# Altium PCB V11_Board.PcbDoc (part 1 of 2)
Units mil, origin at the board's own origin, x right, y up, seen from the top; angles counter-clockwise.
Board outline 6000 x 4000 mil, 2 copper layers (Top Layer, Bottom Layer); 168 components, 105 nets, 506 pads, 0 vias.
Unrouted connection lines stored in the file: 378.
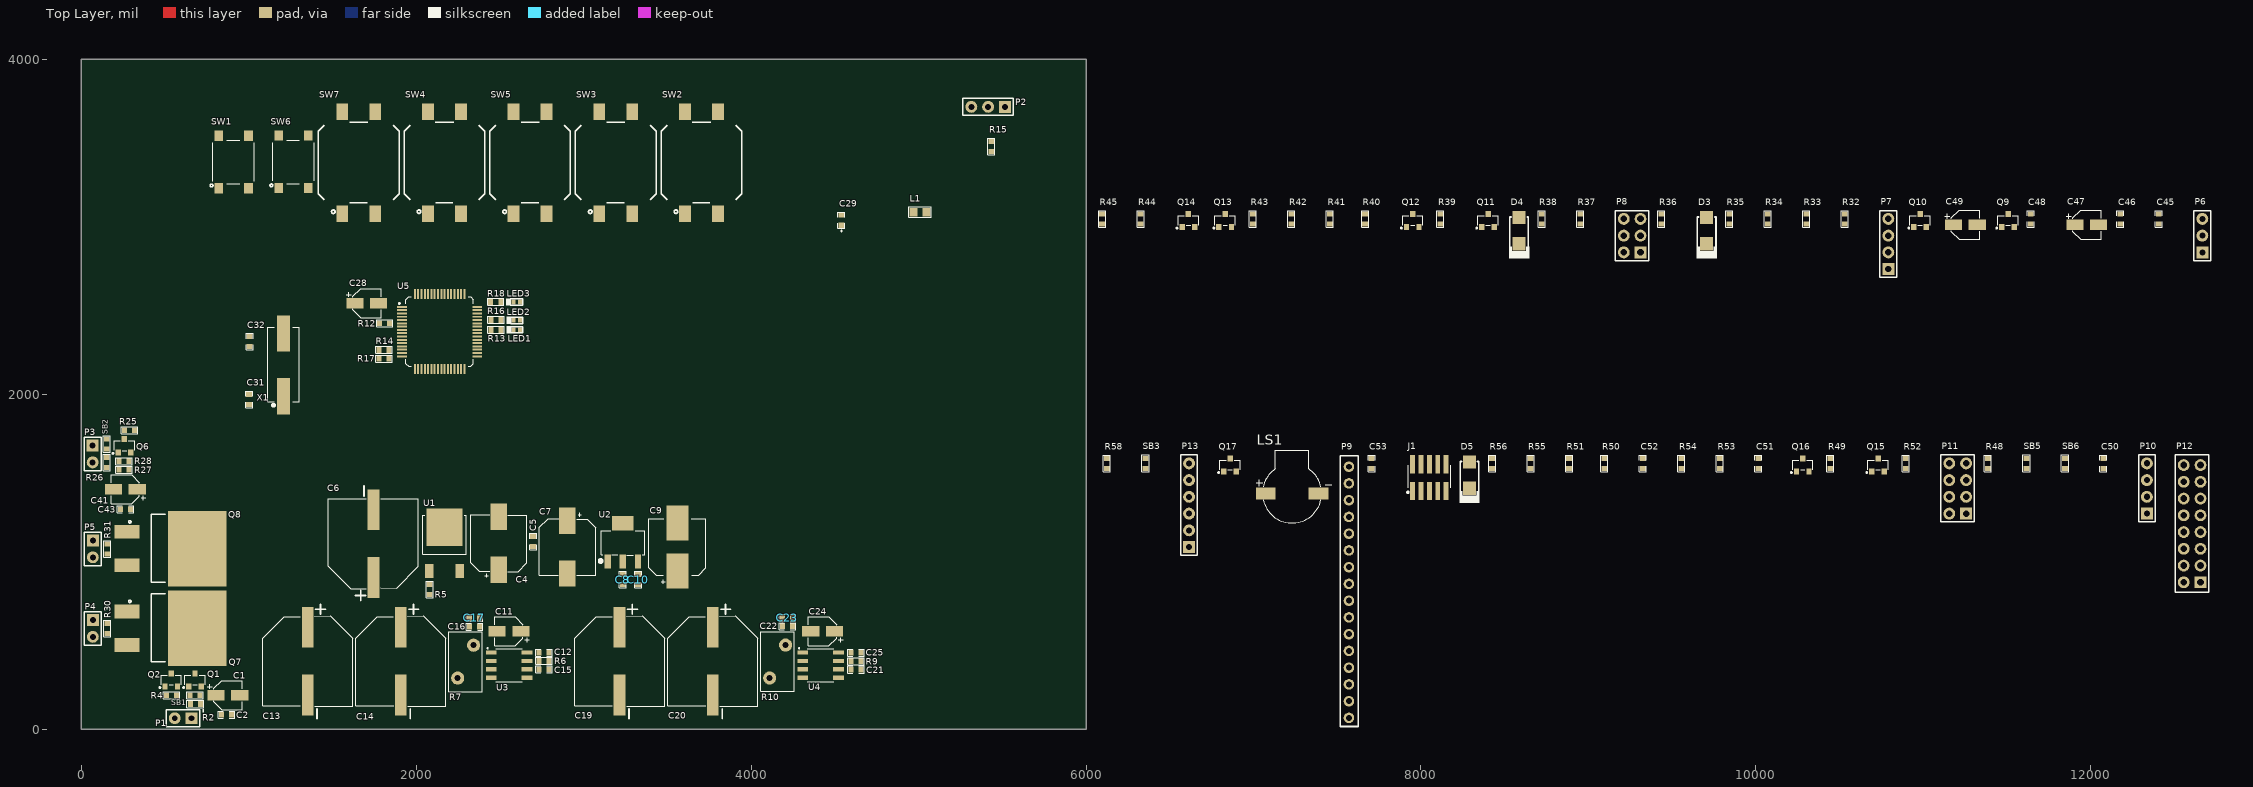
[diagram p0: Top Layer view]
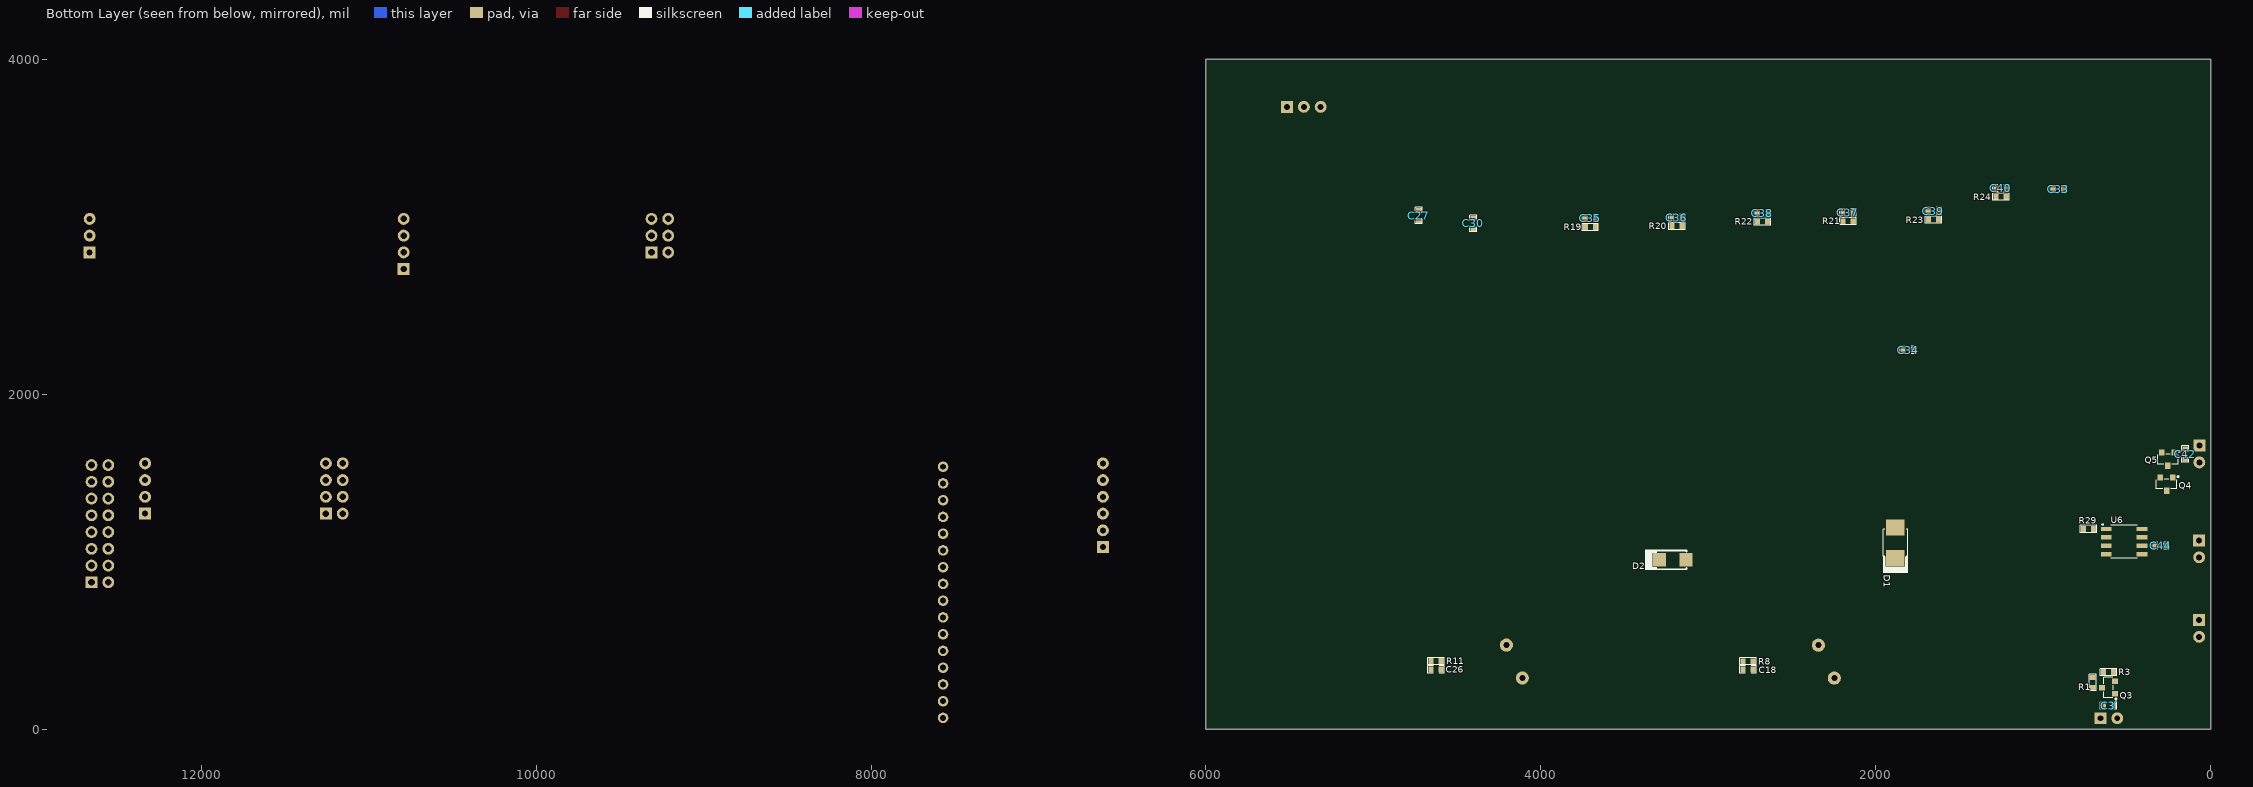
[diagram p1: Bottom Layer view, seen from below]

## Layer stack, top to bottom
Top Solder: solder mask 0.4, Solder Resist, Dk 3.5
Top Layer: signal copper 1.4
Dielectric 1: dielectric 12.6, FR-4, Dk 4.8
Bottom Layer: signal copper 1.4
Bottom Solder: solder mask 0.4, Solder Resist, Dk 3.5

## Board outline
0,0 6000,0 6000,4000 0,4000

## Design rules (kind name [scope] priority, off if disabled: settings)
Clearance [All] p1: gap=7 ignorepadtopadclearanceinfootprint=FALSE except(5: Arc-SMDPad Track-SMDPad SMDPad-SMDPad)
ComponentClearance [All] p1: gap=0 collisioncheckmode=3 verticalgap=0 showdistances=FALSE
HoleSize [All] p1: absolutevalues=TRUE maxlimit=1000 minlimit=1 maxpercent=80.000 minpercent=20.000
HoleToHoleClearance [All] p1: gap=0 allowstackedmicrovias=TRUE
MinimumSolderMaskSliver [All] p1: minsoldermaskwidth=0
PolygonConnect [All] p1: connectstyle=Relief reliefconductorwidth=10 reliefentries=4 polygonreliefangle="90 Angle" airgapwidth=10
RoutingVias [All] p1: holewidth=11.81 width=23.62 viastyle="Through Hole" minholewidth=11.81 minwidth=23.62 maxholewidth=31.5 maxwidth=62.99
SilkToSilkClearance [All] p1: silktosilkclearance=0
SilkToSolderMaskClearance [IsPad] p1: minsilkscreentomaskgap=0 clearancetoexposedcopper=TRUE
SolderMaskExpansion [All] p1: expansion=4 istentingtop=FALSE
Width [All] p1: maxlimit=100 minlimit=8 preferedwidth=12
24 further rules are at their usual default settings.

## Classes and differential pairs
component class U_Temperature_Sensor_Section: C45 C46 C47 C48 C49 D3 D4 P6 P7 P8 Q9 Q10 Q11 Q12 Q13 Q14 R32 R33 R34 R35 R36 R37 R38 R39 R40 R41 R42 R43 R44 R45
component class U_Switches_Sheet: C35 C36 C37 C38 C39 C40 R19 R20 R21 R22 R23 R24 SW2 SW3 SW4 SW5 SW6 SW7
component class U_Regulator_Sheet: C4 C5 C6 C7 C8 C9 C10 D1 D2 R5 U1 U2
component class U_Heater_Sheet: C41 C42 C43 P3 Q4 Q5 Q6 R25 R26 R27 R28 SB2
component class U_Gate_Driver_Sheet: C44 P4 P5 Q7 Q8 R29 R30 R31 U6
component class U_Current_Sense_Sheet: C11 C12 C13 C14 C15 C16 C17 C18 C19 C20 C21 C22 C23 C24 C25 C26 R6 R7 R8 R9 R10 R11 U3 U4
component class U_Controller_Section: C27 C28 C29 C30 C31 C32 C33 C34 L1 LED1 LED2 LED3 P2 R12 R13 R14 R15 R16 R17 R18 SW1 U5 X1
component class U_Connector_Section: C50 C51 C52 C53 D5 J1 LS1 P9 P10 P11 P12 P13 Q15 Q16 Q17 R48 R49 R50 R51 R52 R53 R54 R55 R56 R58 SB3 SB5 SB6
component class U_Battery_Charger_Sheet: C1 C2 C3 P1 Q1 Q2 Q3 R1 R2 R3 R4 SB1

## Components (designator, comment, footprint, x,y, rotation, side; value= is the part's Value field where it differs from the comment)
C1 "10uF" RVT1E100M0405. 875,203 r0 top
C2 "1uF" Cap0603 866,86 r0 top
C3 "0.1uF" Cap0603 611,140 r0 bottom
C4 "220uF" UCD1H221MNL1GS 2494,1109.94 r90 top
C5 "0.1uF" Cap0603 2698,1120 r90 top
C6 "470uF" VT1H471MI135000CE0 1745,1107.61 r90 top
C7 "220uF" UCD1H221MNL1GS 2903,1087 r270 top
C8 "0.1uF" Cap0603 3234,893 r270 top
C9 "100uF" UWX1E101MCL1GB 3560,1087 r90 top
C10 "0.1uF" Cap0603 3325,893 r270 top
C11 "10uF" RVT1E100M0405. 2554,584 r180 top
C12 "0.1uF" Cap0603 2763,457 r0 top
C13 "470uF" VT1H471MI135000CE0 1351,406.07 r270 top
C14 "470uF" VT1H471MI135000CE0 1907,406.07 r270 top
C15 "1uF" Cap0603 2763,357 r0 top
C16 "1uF" Cap0603 2348,612 r180 top
C17 "0.1uF" Cap0603 2348,664 r180 top
C18 "1uF" Cap0603 2762,356 r180 bottom
C19 "470uF" VT1H471MI135000CE0 3214,406.07 r270 top
C20 "470uF" VT1H471MI135000CE0 3770,406.07 r270 top
C21 "1uF" Cap0603 4626,356 r0 top
C22 "1uF" Cap0603 4217,615 r180 top
C23 "0.1uF" Cap0603 4217,666 r180 top
C24 "10uF" RVT1E100M0405. 4427,584 r180 top
C25 "0.1uF" Cap0603 4626,457 r0 top
C26 "1uF" Cap0603 4626,356 r180 bottom
C27 "0.1uF" Cap0603 4728,3067 r90 bottom
C28 "10uF" RVT1E100M0405. 1705,2544 r0 top
C29 "1uF" F981E105MMA 4539,3039 r90 top
C30 "0.1uF" Cap0603 4404,3020 r90 bottom
C31 "30pF" Cap0603 1002,1969 r90 top
C32 "30pF" Cap0603 1005,2314 r90 top
C33 "0.1uF" Cap0603 910,3225 r180 bottom
C34 "0.1uF" Cap0603 1807,2264 r180 bottom
C35 "0.1uF" Cap0603 3705,3050 r0 bottom
C36 "0.1uF" Cap0603 3188,3055 r0 bottom
C37 "0.1uF" Cap0603 2167,3085 r0 bottom
C38 "0.1uF" Cap0603 2677,3081 r0 bottom
C39 "0.1uF" Cap0603 1656,3094 r0 bottom
C40 "0.1uF" Cap0603 1253,3229 r0 bottom
C41 "10uF" RVT1E100M0405. 263,1432 r180 top
C42 "0.1uF" Cap0603 152,1642 r90 bottom
C43 "1uF" Cap0603 264,1313 r180 top
C44 "0.1uF" Cap0603 299,1095 r180 bottom
C45 "0.1uF" Cap0603 12406,3047 r90 top
C46 "0.1uF" Cap0603 12176,3047 r90 top
C47 "10uF" RVT1E100M0405. 11976,3012 r0 top
C48 "0.1uF" Cap0603 11641,3047 r90 top
C49 "10uF" RVT1E100M0405. 11251,3012 r0 top
C50 "0.1uF" Cap0603 12075,1587 r90 top
C51 "0.1uF" Cap0603 10015,1587 r90 top
C52 "0.1uF" Cap0603 9325,1587 r90 top
C53 "1uF" Cap0603 7705,1587 r90 top
D1 "SS510B" SS510B 1883,1113 r90 bottom
D2 "1SMA5930BT3G" SMA 3212,1011 r180 bottom
D3 "SMAJ5.0CA" SMA 9706,2977 r90 top
D4 "SMAJ5.0CA" SMA 8586,2977 r90 top
D5 "SMAJ5.0CA" SMA 8290,1517 r90 top
J1 "FTSH-105-01-L-DV-K-TR" FTSH-105-01-L-DV-K-TR 8050,1502 r0 top
L1 "10uH" Ind0805 5008,3087 r0 top
LED1 "XZMDK68W-2" "LED 0402" 2600.7,2385 r180 top
LED2 "XZMDK68W-2" "LED 0402" 2600.7,2441 r180 top
LED3 "XZMDK68W-2" "LED 0402" 2600,2551 r180 top
LS1 "YS-SBZ9032C03R16" YS-SBZ9032C03R16 7230,1408 r0 top
P1 "61300211121" HDR1X2 658,65 r180 top
P2 "61300311121" HDR1X3 5515,3716 r180 top
P3 "61300211121" HDR1X2 68,1693 r270 top
P4 "61300211121" HDR1X2 69,651 r270 top
P5 "61300211121" HDR1X2 69,1126 r270 top
P6 "61300311121" HDR1X3 12666,2847 r90 top
P7 "61300411121" HDR1X4 10791,2747 r90 top
P8 "M20-9980346" HDR2X3 9311,2847 r90 top
P9 "PPPC161LFBN-RC" PPPC161LFBN-RC 7570,817 r90 top
P10 "61300411121" HDR1X4 12335,1287 r90 top
P11 "M20-9760446" HDR2X4 11255,1287 r90 top
P12 "PPTC082LFBN-RC" HDR2X8 12605,1227 r90 top
P13 "61300611121" HDR1X6 6615,1087 r90 top
Q1 "IRLML6402TRPBF" SOT-23 679,293 r0 top
Q2 "MMBT5551" SOT-23 537,293 r0 top
Q3 "IRLML2502TRPBF" SOT-23 611,248 r90 bottom
Q4 "IRLML6402TRPBF" SOT-23 263,1463 r0 bottom
Q5 "MMBT5551" SOT-23 256,1612 r0 bottom
Q6 "IRLML2502TRPBF" SOT-23 257,1692 r0 top
Q7 "IRF3205STRLPBF" D2Pak 482,603 r270 top
Q8 "IRF3205STRLPBF" D2Pak 482,1078 r270 top
Q9 "MMBT5551" SOT-23 11506,3037 r0 top
Q10 "MMBT5551" SOT-23 10981,3037 r0 top
Q11 "IRLML6402TRPBF" SOT-23 8401,3037 r0 top
Q12 "MMBT5551" SOT-23 7951,3037 r0 top
Q13 "MMBT5551" SOT-23 6831,3037 r0 top
Q14 "MMBT5551" SOT-23 6611,3037 r0 top
Q15 "MMBT5551" SOT-23 10730,1577 r0 top
Q16 "IRLML2502TRPBF" SOT-23 10280,1577 r0 top
Q17 "MMBT5551" SOT-23 6860,1577 r0 top
R1 "1K" RES-0603 705,279 r90 bottom
R2 "10K" RES-0603 680,202 r0 top
R3 "1K" RES-0603 611,341 r180 bottom
R4 "10K" RES-0603 539,202 r180 top
R5 "33R" RES-0603 2080,834 r270 top
R6 "2.2K" RES-0603 2763,407 r180 top
R7 "MOV-07D220K" MOV-07D220K 2295,403 r90 top
R8 "470K" RES-0603 2762,405 r0 bottom
R9 "2.2K" RES-0603 4626,406 r180 top
R10 "MOV-07D220K" MOV-07D220K 4158,403.74 r90 top
R11 "470K" RES-0603 4626,406.5 r0 bottom
R12 "390R" RES-0603 1812,2424 r180 top
R13 "680R" RES-0603 2475.7,2384 r0 top
R14 "6.8K" RES-0603 1808,2265 r0 top
R15 "2.2K" RES-0603 5434,3479 r90 top
R16 "680R" RES-0603 2475.7,2444 r0 top
R17 "3.3K" RES-0603 1808,2213 r0 top
R18 "680R" RES-0603 2475,2551 r0 top
R19 "2.2K" RES-0603 3705,2998 r180 bottom
R20 "2.2K" RES-0603 3188,3004 r180 bottom
R21 "2.2K" RES-0603 2167,3033 r180 bottom
R22 "2.2K" RES-0603 2677,3030 r180 bottom
R23 "2.2K" RES-0603 1656,3043 r180 bottom
R24 "330R" RES-0603 1253,3178 r180 bottom
R25 "1K" RES-0603 287,1785 r0 top
R26 "10K" RES-0603 152,1593 r90 top
R27 "1K" RES-0603 256,1550 r0 top
R28 "10K" RES-0603 256,1601 r180 top
R29 "1K" RES-0603 730,1195 r0 bottom
R30 "47R" RES-0603 156,602 r270 top
R31 "47R" RES-0603 156,1076 r270 top
R32 "10K" RES-0603 10531,3047 r90 top
R33 "330 ohm" RES-0603 10301,3047 r90 top
R34 "10K" RES-0603 10071,3047 r90 top
R35 "1.5R" RES-0603 9841,3047 r90 top
R36 "330R" RES-0603 9436,3047 r90 top
R37 "0R" RES-0603 8951,3047 r90 top
R38 "0R" RES-0603 8721,3047 r90 top
R39 "1K" RES-0603 8116,3047 r90 top
R40 "1.5R" RES-0603 7666,3047 r90 top
R41 "10K" RES-0603 7456,3047 r90 top
R42 "10K" RES-0603 7226,3047 r90 top
R43 "1K" RES-0603 6996,3047 r90 top
R44 "4.7K" RES-0603 6326,3047 r90 top
R45 "4.7K" RES-0603 6096,3047 r90 top
R48 "10K" RES-0603 11385,1587 r90 top
R49 "10K" RES-0603 10445,1587 r90 top
R50 "2.2K" RES-0603 9095,1587 r90 top
R51 "10K" RES-0603 8885,1587 r90 top
R52 "0R" RES-0603 10895,1587 r90 top
R53 "4.7K" RES-0603 9785,1587 r90 top
R54 "4.7K" RES-0603 9555,1587 r90 top
R55 "1K" RES-0603 8655,1587 r90 top
R56 "1K" RES-0603 8425,1587 r90 top
R58 "4.7K" RES-0603 6125,1587 r90 top
SB1 "Solder Bridge" "Solder Bridge" 681,150 r180 top
SB2 "Solder Bridge" "Solder Bridge" 152,1703 r90 top
SB3 "Solder Bridge" "Solder Bridge" 6355,1587 r90 top
SB5 "Solder Bridge" "Solder Bridge" 11615,1587 r90 top
SB6 "Solder Bridge" "Solder Bridge" 11845,1587 r90 top
SW1 "PTS645SM43SMTR92LFS" PTS645SM43SMTR92LFS 910,3387 r90 top
SW2 "Tactile Switch" TL3300CF160Q 3703,3383 r90 top
SW3 "Tactile Switch" TL3300CF160Q 3191.5,3383 r90 top
SW4 "Tactile Switch" TL3300CF160Q 2168.5,3383 r90 top
SW5 "Tactile Switch" TL3300CF160Q 2680,3383 r90 top
SW6 "PTS645SM43SMTR92LFS" PTS645SM43SMTR92LFS 1267,3388 r90 top
SW7 "Tactile Switch" TL3300CF160Q 1657,3383 r90 top
U1 "LM78M05CDT" TO-252-3 2169,1075 r0 top
U2 "LMS8117AMP-3.3/NOPB" SOT-223 3234,1115 r0 top
U3 "ACS723LLCTR-20AU-T" SOIC-8 2554,382 r0 top
U4 "ACS723LLCTR-20AU-T" SOIC-8 4414,382 r0 top
U5 "STM32F072R8T6" "64LQFP (10X10)" 2140,2374 r0 top
U6 "NCP81071ADR2G" SOIC-8 518,1120 r180 bottom
X1 "9C-8.000MEEJ-T" 9C-8.000MEEJ-T 1207,2175 r90 top

## Footprints (in the part's own frame and the unit in brackets; to place one, negate y for a bottom-side part, rotate by r counter-clockwise, add the part's x,y. Pads: shape width x height; smd on the part's side, far side on the other; paste and mask are expansions set on the pad)
9C-8.000MEEJ-T [mm] "CRYSTAL 8.0000MHZ 18PF SMD"
  rect 5.5x2 smd: 1(-4.75,0) 2(4.75,0)
  silkscreen extent -6.25,-2.41 5.71,2.41, body extent -6.07,-2.35 6.23,2.35, height 4.36
"64LQFP (10X10)" [mm]
  rect 1.5x0.3 smd: 1(-5.7,3.75) 2(-5.7,3.25) 3(-5.7,2.75) 4(-5.7,2.25) 5(-5.7,1.75) 6(-5.7,1.25) 7(-5.7,0.75) 8(-5.7,0.25) 9(-5.7,-0.25) 10(-5.7,-0.75) 11(-5.7,-1.25) 12(-5.7,-1.75) 13(-5.7,-2.25) 14(-5.7,-2.75) 15(-5.7,-3.25) 16(-5.7,-3.75) 33(5.7,-3.75) 34(5.7,-3.25) 35(5.7,-2.75) 36(5.7,-2.25) 37(5.7,-1.75) 38(5.7,-1.25) 39(5.7,-0.75) 40(5.7,-0.25) 41(5.7,0.25) 42(5.7,0.75) 43(5.7,1.25) 44(5.7,1.75) 45(5.7,2.25) 46(5.7,2.75) 47(5.7,3.25) 48(5.7,3.75)
  rect 0.3x1.5 smd: 17(-3.75,-5.7) 18(-3.25,-5.7) 19(-2.75,-5.7) 20(-2.25,-5.7) 21(-1.75,-5.7) 22(-1.25,-5.7) 23(-0.75,-5.7) 24(-0.25,-5.7) 25(0.25,-5.7) 26(0.75,-5.7) 27(1.25,-5.7) 28(1.75,-5.7) 29(2.25,-5.7) 30(2.75,-5.7) 31(3.25,-5.7) 32(3.75,-5.7) 49(3.75,5.7) 50(3.25,5.7) 51(2.75,5.7) 52(2.25,5.7) 53(1.75,5.7) 54(1.25,5.7) 55(0.75,5.7) 56(0.25,5.7) 57(-0.25,5.7) 58(-0.75,5.7) 59(-1.25,5.7) 60(-1.75,5.7) 61(-2.25,5.7) 62(-2.75,5.7) 63(-3.25,5.7) 64(-3.75,5.7)
  silkscreen extent -6.22,-5.26 5.13,5.26, body extent -6.01,-6.01 6.01,6.01, height 1.6
Cap0603 [mil]
  rect 30x35 smd mask+2.36: 1(-30,0) 2(30,0)
  silkscreen extent -49,-21 49,21, body extent -32,-16 31,16, height 34
D2Pak [mm]
  rect 2.08x3.81 smd: 1(-2.54,-5.335) 3(2.54,-5.335)
  rect 11.43x8.89 smd: 2(0,5.335)
  silkscreen extent -5.21,-5.05 5.11,0.51, body extent -5.08,-6.6 5.02,8.79, height 4.5
F981E105MMA [mil]
  rect 30x35 smd mask+2.36: 1(-30,0) 2(30,0)
  silkscreen extent -72,-21 49,21, body extent -32,-16 31,16, height 34
FTSH-105-01-L-DV-K-TR [mm]
  rect 0.74x2.79 smd: 1(-2.54,-2.035) 2(-2.54,2.035) 3(-1.27,-2.035) 4(-1.27,2.035) 5(0,-2.035) 6(0,2.035) 7(1.27,-2.035) 8(1.27,2.035) 9(2.54,-2.035) 10(2.54,2.035)
  silkscreen extent -3.39,-2.37 3.23,1.88, body extent -3.18,-2.84 3.17,3, height 6.11
HDR1X2 [mm] "CONN HEADER VERT 2POS 2.54MM"
  rect 1.8x1.8 hole 0.9: 1(0,0)
  round 1.8 hole 0.9: 2(2.54,0)
  silkscreen extent -1.27,-1.27 3.81,1.27, body extent -1.27,-1.27 3.81,1.27, height 8.44
HDR1X3 [mm] "Connector; Header; 3 Position"
  rect 1.8x1.8 hole 0.9: 1(0,0)
  round 1.8 hole 0.9: 2(2.54,0) 3(5.08,0)
  silkscreen extent -1.27,-1.27 6.35,1.27, body extent -1.27,-1.24 6.35,1.25, height 8.54
HDR1X4 [mm] "Connector; Header; 4 Position"
  rect 1.8x1.8 hole 0.95: 1(0,0)
  round 1.8 hole 0.95: 2(2.54,0) 3(5.08,0) 4(7.62,0)
  silkscreen extent -1.27,-1.27 8.89,1.27, body extent -1.27,-1.27 8.89,1.27, height 9.5
HDR1X6 [mm] "Connector; Header; 6 Position"
  rect 1.8x1.8 hole 0.9: 1(0,0)
  round 1.8 hole 0.9: 2(2.54,0) 3(5.08,0) 4(7.62,0) 5(10.16,0) 6(12.7,0)
  silkscreen extent -1.27,-1.27 13.97,1.27, body extent -1.27,-1.24 13.97,1.25, height 8.54
HDR2X3 [mm] "Connector; Header; 3x2 Position"
  rect 1.8x1.8 hole 1: 1(0,0)
  round 1.8 hole 1: 2(0,2.54) 3(2.54,0) 4(2.54,2.54) 5(5.08,0) 6(5.08,2.54)
  silkscreen extent -1.27,-1.27 6.35,3.81, body extent -1.27,-1.3 6.35,3.78, height 9.2
HDR2X4 [mm] "Connector; Header; 4x2 Position"
  rect 1.8x1.8 hole 1: 1(0,0)
  round 1.8 hole 1: 2(0,2.54) 3(2.54,0) 4(2.54,2.54) 5(5.08,0) 6(5.08,2.54) 7(7.62,0) 8(7.62,2.54)
  silkscreen extent -1.27,-1.27 8.89,3.81, body extent -1.24,-1.27 8.92,3.71, height 8.84
HDR2X8 [mm] "Connector; Header; 8x2 Position"
  rect 1.8x1.8 hole 1: 1(-8.89,-1.27)
  round 1.8 hole 1: 2(-8.89,1.27) 3(-6.35,-1.27) 4(-6.35,1.27) 5(-3.81,-1.27) 6(-3.81,1.27) 7(-1.27,-1.27) 8(-1.27,1.27) 9(1.27,-1.27) 10(1.27,1.27) 11(3.81,-1.27) 12(3.81,1.27) 13(6.35,-1.27) 14(6.35,1.27) 15(8.89,-1.27) 16(8.89,1.27)
  silkscreen extent -10.39,-2.54 10.41,2.54, body extent -10.41,-2.5 10.41,2.5, height 8.5
Ind0805 [mm] "Inductor 0805"
  rect 1.2x1.32 smd: 1(-1,0) 2(1,0)
  silkscreen extent -1.72,-0.79 1.73,0.79, body extent -1,-0.62 1,0.63, height 0.47
"LED 0402" [mm]
  rect 0.62x0.72 smd: 1(-0.475,0) 2(0.475,0)
  silkscreen extent -0.91,-0.56 1.6,0.56, body extent -0.5,-0.25 0.51,0.25, height 0.45
MOV-07D220K [mm]
  round 2 hole 0.9: 1(-2.5,1.206) 2(2.5,-1.206)
  silkscreen extent -4.55,-2.54 4.55,2.54, body extent -4.5,-2.5 4.5,2.5, height 12.5
PPPC161LFBN-RC [mm] "CONN HDR 16POS 0.1 GOLD PCB"
  round 1.6 hole 0.9: 1(-19.05,0) 2(-16.51,0) 3(-13.97,0) 4(-11.43,0) 5(-8.89,0) 6(-6.35,0) 7(-3.81,0) 8(-1.27,0) 9(1.27,0) 10(3.81,0) 11(6.35,0) 12(8.89,0) 13(11.43,0) 14(13.97,0) 15(16.51,0) 16(19.05,0)
  silkscreen extent -20.35,-1.42 20.73,1.32, body extent -20.59,-1.3 20.55,1.2, height 5
PTS645SM43SMTR92LFS [mm] "SWITCH TACTILE SPST-NO 0.05A 12V"
  rect 1.55x1.3 smd: 1(-3.975,2.25) 2(3.975,2.25) 3(-3.975,-2.25) 4(3.975,-2.25)
  silkscreen extent -3.79,-3.15 3.3,3.56, body extent -4.5,-3.1 4.5,3.1, height 13
RES-0603 [mil]
  rect 30x35 smd: 1(-30,0) 2(30,0)
  silkscreen extent -49,-21 49,21, body extent -31,-17 31,17, height 18
RVT1E100M0405. [mm] "10uF 25V 5.4mm SMD"
  rect 2.6x1.6 smd: 1(-1.8,0) 2(1.8,0)
  silkscreen extent -3.1,-2.21 2.16,2.21, body extent -2.65,-2.15 2.65,2.15, height 3.95
SMA [mm]
  rect 2x2 smd: 1(-2,0) 2(2,0)
  silkscreen extent -4.24,-1.55 2.08,1.55, body extent -2.6,-1.3 2.6,1.3, height 2.4
SOIC-8 [mm]
  rect 1.6x0.65 smd: 1(-2.667,1.905) 2(-2.667,0.635) 3(-2.667,-0.635) 4(-2.667,-1.905) 5(2.733,-1.905) 6(2.733,-0.635) 7(2.733,0.635) 8(2.733,1.905)
  silkscreen extent -3.34,-2.54 1.99,2.68, body extent -3,-2.46 3,2.46, height 1.61
"Solder Bridge" [mil] "Solder Bridge ON"
  rect 30x35 smd: 1(-30,0) 2(30,0)
  silkscreen extent -50,-22 50,22
SOT-23 [mm] "TRANS NPN 40V 0.6A SOT23"
  rect 0.82x0.92 smd: 1(-0.95,-1) 2(0.95,-1) 3(0,1)
  silkscreen extent -1.82,-1.23 1.55,0.74, body extent -1.5,-1.25 1.5,1.25, height 1.1
SOT-223 [mm]
  rect 0.95x2.15 smd: 1(-2.3,-2.9) 2(0,-2.9) 3(2.3,-2.9)
  rect 3.25x2.15 smd: 4(0,2.9)
  silkscreen extent -3.6,-3.07 3.3,1.75, body extent -3.28,-3.51 3.22,3.45, height 1.65
SS510B [mm]
  rect 2.4x2.8 smd: 1(-2.3,0) 2(2.3,0)
  silkscreen extent -4.57,-1.91 2.03,1.91, body extent -2.7,-1.8 2.7,1.8, height 2.3
TL3300CF160Q [mm] "SWITCH TACTILE SPST-NO 0.05A 12V"
  rect 2.5x1.8 smd: 1(-7.75,2.5) 2(7.75,2.5) 3(-7.75,-2.5) 4(7.75,-2.5)
  silkscreen extent -7.71,-6.12 6.15,6.12, body extent -7.5,-5.98 7.5,6.02, height 8.77
TO-252-3 [mm]
  rect 1.3x2.15 smd: 1(-2.285,-3.333) 3(2.285,-3.333)
  rect 5.5x5.7 smd: 2(0,3.333)
  silkscreen extent -3.33,-0.81 3.33,5.13, body extent -3.27,-3.79 3.27,6.12, height 2.67
UCD1H221MNL1GS [mm] "CAP ALUM 220UF 20% 50V SMD"
  rect 4x2.5 smd: 1(-4,0) 2(4,0)
  silkscreen extent -5.18,-4.24 4.29,4.29, body extent -4.67,-4.23 4.62,4.28, height 10.34
UWX1E101MCL1GB [mm]
  rect 5.3x3.3 smd: 1(-3.65,0) 2(3.65,0)
  silkscreen extent -5.59,-4.32 4.27,4.32, body extent -4.65,-4.25 4.65,4.25, height 10.34
VT1H471MI135000CE0 [mm] "470uF ±20% 50V 12.5mm 13.5mm 1000hrs 105? -40?~+105? SMD,12.5x13.5mm Aluminum Electrolytic Capacitors - SMD RoHS"
  rect 6.2x1.75 smd: 1(-5.145,0) 2(5.145,0)
  silkscreen extent -8.62,-6.81 8.74,6.86, body extent -7.5,-6.85 7.5,6.85, height 14
YS-SBZ9032C03R16 [mm] "NO 2700Hz 85dB @ 3V, 10cm 3V F9mm SMD,9x3.2mm Buzzers RoHS"
  rect 3x1.8 smd: 1(-4,0) 2(4,0)
  silkscreen extent -5.46,-4.5 6.06,6.54, body extent -5.25,-4.5 5.25,6.5, height 3.3

## Part data
C1 C11 C24 C28 C41 C47 C49: library part RVT1E100M0405, "CAP ALUM 10uF 25V SMD", MANUFACTURER=ROQANG, Operating Temperature=-45℃~+105℃, Rated Voltage=25V, Tolerance=±20%, Capacitance=10uF, L=5.4mm, φD=4mm
C2 C15 C16 C18 C21 C22 C26 C43 C53: library part CC0603KRX5R8BB105, "CAP CER 1UF 25V X5R 0603", Case Code (Imperial)=0603, Case Code (Metric)=1608, Dielectric=X5R, MANUFACTURER=Yageo, Max Operating Temperature=85°C, Min Operating Temperature=-55°C, Package Quantity=1, Supplier Part Number 1=311-1445-6-ND, Tolerance=10%, Voltage Rating=25V, Capacitance=1uF, Case/Package=0603, ComponentLink1Description=http://www.yageo.com/documents/recent/UPY-GPHC_X5R_4V-to-50V_25.pdf?src-supplier=Digi-Key, ComponentLink1URL=http://www.yageo.com/documents/recent/UPY-GPHC_X5R_4V-to-50V_25.pdf?src-supplier=Digi-Key, ComponentLink2Description=http://www.yageo.com/documents/recent/UPY-GPHC_X5R_4V-to-50V_12.pdf?src-supplier=Avnet+Europe, ComponentLink2URL=http://www.yageo.com/documents/recent/UPY-GPHC_X5R_4V-to-50V_12.pdf?src-supplier=Avnet+Europe, ComponentLink3Description=http://www.farnell.com/datasheets/1525783.pdf?src-supplier=Element14, ComponentLink3URL=http://www.farnell.com/datasheets/1525783.pdf?src-supplier=Element14, ComponentLink4Description=http://www.yageo.com/documents/recent/UPY-GPHC_X5R_4V-to-50V_12.pdf?src-supplier=Avnet, ComponentLink4URL=http://www.yageo.com/documents/recent/UPY-GPHC_X5R_4V-to-50V_12.pdf?src-supplier=Avnet, Depth=0.8mm, Halogen Free="Halogen Free", Height=0.8mm, Lead Free="Lead Free", Length=1.6mm, Manufacturer Part Number=CC0603KRX5R8BB105, Mount="Surface Mount", Number of Pins=2, Packaging="Tape and Reel", Pricing 1="1=0.1, 10=0.069, 100=0.0307, 500=0.0219, 1000=0.0172 (USD)", Radiation Hardening=No, REACH SVHC="No SVHC", Stock 1=1419041, Supplier 1=Digi-Key, Termination=SMD/SMT, Thickness=0.035inch, Voltage Rating (DC)=25V, Width=0.031inch
C3 C5 C8 C10 C12 C17 C23 C25 C27 C30 C33 C34 C35 C36 C37 C38 C39 C40 C42 C44 C45 C46 C48 C50 C51 C52: library part CC0603ZRY5V9BB104, "CAP CER 0.1UF 50V Y5V 0603", Capacitance=100nF, Case Code (Imperial)=0603, Case Code (Metric)=1608, Dielectric=Y5V, MANUFACTURER=Yageo, Max Operating Temperature=85°C, Min Operating Temperature=-30°C, Package Quantity=1, Supplier Part Number 1=311-1343-1-ND, Tolerance=80%, Voltage=50V, Case/Package=0603, ComponentLink1Description=http://www.yageo.com/documents/recent/UPY-GPHC_Y5V_6.3V-to-50V_8.pdf?src-supplier=Digi-Key, ComponentLink1URL=http://www.yageo.com/documents/recent/UPY-GPHC_Y5V_6.3V-to-50V_8.pdf?src-supplier=Digi-Key, ComponentLink2Description=http://www.yageo.com/documents/recent/UPY-GPHC_Y5V_6.3V-to-50V_5.pdf?src-supplier=Avnet+Europe, ComponentLink2URL=http://www.yageo.com/documents/recent/UPY-GPHC_Y5V_6.3V-to-50V_5.pdf?src-supplier=Avnet+Europe, ComponentLink3Description=https://www.verical.com/server-webapp/html/getDatasheet?partID=403611&src-supplier=Verical, ComponentLink3URL=https://www.verical.com/server-webapp/html/getDatasheet?partID=403611&src-supplier=Verical, ComponentLink4Description=http://www.mouser.com/ds/2/447/Yageo_UPY-GP_NP0_16V-to-50V_9-358835.pdf?src-supplier=Mouser, ComponentLink4URL=http://www.mouser.com/ds/2/447/Yageo_UPY-GP_NP0_16V-to-50V_9-358835.pdf?src-supplier=Mouser, ComponentLink5Description=http://www.farnell.com/datasheets/1132289.pdf?src-supplier=Element14, ComponentLink5URL=http://www.farnell.com/datasheets/1132289.pdf?src-supplier=Element14, Composition=Ceramic, Depth=0.8mm, Halogen Free="Halogen Free", Height=0.8mm, Lead Free="Lead Free", Length=1.6mm, Manufacturer Part Number=CC0603ZRY5V9BB104, Mount="Surface Mount", Number of Pins=2, Packaging="Tape and Reel", Pricing 1="1=0.1, 10=0.075, 100=0.0334, 500=0.02386, 1000=0.01874 (USD)", Radiation Hardening=No, REACH SVHC="No SVHC", Stock 1=15000880, Supplier 1=Digi-Key, Termination=SMD/SMT, Thickness=0.035inch, Voltage Rating=50V, Voltage Rating (DC)=50V, Width=0.031inch
C4 C7: library part UCD1H221MNL1GS, "CAP ALUM 220UF 20% 50V SMD", Case/Package=Radial, Leakage Current=3uA, MANUFACTURER=Nichicon, Max Operating Temperature=105°C, Min Operating Temperature=-55°C, Package Quantity=1, Ripple Current=700mA, Supplier Part Number 1=493-6390-1-ND, Tolerance=20%, Voltage=50V, Capacitance=220uF, Category="Aluminum Electrolytic Capacitors", ComponentLink1Description=https://datasheet.ciiva.com/11776/0900766b80ebdadd-11776792.pdf?src-supplier=RSComponents, ComponentLink1URL=https://datasheet.ciiva.com/11776/0900766b80ebdadd-11776792.pdf?src-supplier=RSComponents, ComponentLink2Description=https://datasheet.ciiva.com/5362/e-cd-22158-5362489.pdf?src-supplier=Mouser, ComponentLink2URL=https://datasheet.ciiva.com/5362/e-cd-22158-5362489.pdf?src-supplier=Mouser, ComponentLink3Description=https://datasheet.ciiva.com/11684/e-cd-11684678.pdf?src-supplier=Avnet, ComponentLink3URL=https://datasheet.ciiva.com/11684/e-cd-11684678.pdf?src-supplier=Avnet, ComponentLink4Description=https://datasheet.ciiva.com/15037/e-cd-15037119.pdf?src-supplier=Digi-Key, ComponentLink4URL=https://datasheet.ciiva.com/15037/e-cd-15037119.pdf?src-supplier=Digi-Key, ComponentLink5Description=https://datasheet.ciiva.com/16393/e-cd-16393493.pdf?src-supplier=Future+Electronics, ComponentLink5URL=https://datasheet.ciiva.com/16393/e-cd-16393493.pdf?src-supplier=Future+Electronics, ComponentLink6Description=https://datasheet.ciiva.com/17354/e-cd-17354606.pdf?src-supplier=Avnet+Europe, ComponentLink6URL=https://datasheet.ciiva.com/17354/e-cd-17354606.pdf?src-supplier=Avnet+Europe, Construction=Cylindrical, Diameter=10mm, Dissipation Factor=0.1%, Features="General Purpose", Height=10mm, Height - Seated (Max)=0.394inch, Impedance=160mR, Lead Free="Lead Free", Length=10mm, Life (Hours)=5000Hour, Manufacturer Part Number=UCD1H221MNL1GS, Mount="Surface Mount,PCB", Packaging="Tape and Reel", Pricing 1="1=0.85000, 10=0.60200, 50=0.45480, 100=0.39620 (USD)", Radiation Hardening=No, RoHS=Yes, RoHS Compliant=Yes, Series=CD, Supplier 1=Digi-Key, Termination=SMD/SMT, Voltage Rating=50V, Voltage Rating (DC)=50V
C6 C13 C14 C19 C20: library part VT1H471MI135000CE0, "470uF ±20% 50V 12.5mm 13.5mm 1000hrs 105℃ -40℃~+105℃ SMD,12.5x13.5mm Aluminum Electrolytic Capacitors - SMD RoHS", Lifetime @ Temp="1000hrs 105℃", MANUFACTURER="Changzhou Huawei Elec", Operating Temperature=-40℃~+105℃, Package=SMD,12.5x13.5mm, Rated Voltage=50V, Tolerance=±20%, Capacitance=470uF, L=13.5mm, φD=12.5mm
C9: library part UWX1E101MCL1GB, "CAP ALUM 100UF 20% 25V SMD", Case/Package=Radial, Dielectric Material=Aluminium, Leakage Current=3uA, MANUFACTURER=Nichicon, Max Operating Temperature=85°C, Min Operating Temperature=-40°C, Package Quantity=1000, Ripple Current=110mA, Supplier Part Number 1=493-2113-6-ND, Tolerance=20%, Voltage=25V, Capacitance=100uF, Category="Aluminum Electrolytic Capacitors", ComponentLink1Description=http://nichicon-us.com/english/products/pdfs/e-uwx.pdf?src-supplier=Digi-Key, ComponentLink1URL=http://nichicon-us.com/english/products/pdfs/e-uwx.pdf?src-supplier=Digi-Key, ComponentLink2Description=http://www.nichicon.co.jp/english/products/pdfs/e-ch_ref.pdf?src-supplier=Mouser, ComponentLink2URL=http://www.nichicon.co.jp/english/products/pdfs/e-ch_ref.pdf?src-supplier=Mouser, ComponentLink3Description=http://www.nichicon.co.jp/english/products/pdfs/e-wx.pdf?src-supplier=Avnet, ComponentLink3URL=http://www.nichicon.co.jp/english/products/pdfs/e-wx.pdf?src-supplier=Avnet, ComponentLink4Description=http://uk.rs-online.com/webdocs/0fa3/0900766b80fa3a90.pdf?src-supplier=RSComponents, ComponentLink4URL=http://uk.rs-online.com/webdocs/0fa3/0900766b80fa3a90.pdf?src-supplier=RSComponents, ComponentLink5Description=http://nichicon-us.com/english/products/pdfs/e-wx.pdf?src-supplier=Future+Electronics, ComponentLink5URL=http://nichicon-us.com/english/products/pdfs/e-wx.pdf?src-supplier=Future+Electronics, ComponentLink6Description=http://www.nichicon.co.jp/english/products/pdfs/e-ch_ref.pdf?src-supplier=Avnet+Europe, ComponentLink6URL=http://www.nichicon.co.jp/english/products/pdfs/e-ch_ref.pdf?src-supplier=Avnet+Europe, ComponentLink7Description=http://www.farnell.com/datasheets/2364658.pdf?src-supplier=Element14, ComponentLink7URL=http://www.farnell.com/datasheets/2364658.pdf?src-supplier=Element14, ComponentLink8Description=https://datasheet.ciiva.com/11778/0900766b80fa3a90-11778418.pdf?src-supplier=RSComponents, ComponentLink8URL=https://datasheet.ciiva.com/11778/0900766b80fa3a90-11778418.pdf?src-supplier=RSComponents, ComponentLink9Description=https://datasheet.ciiva.com/17527/e-wx-17527624.pdf?src-supplier=Avnet+Europe, ComponentLink9URL=https://datasheet.ciiva.com/17527/e-wx-17527624.pdf?src-supplier=Avnet+Europe, ComponentLink10Description=https://datasheet.ciiva.com/5361/e-wx-11809-5361100.pdf?src-supplier=Mouser, ComponentLink10URL=https://datasheet.ciiva.com/5361/e-wx-11809-5361100.pdf?src-supplier=Mouser, ComponentLink11Description=https://datasheet.ciiva.com/28458/1912851-28458684.pdf?src-supplier=Element14, ComponentLink11URL=https://datasheet.ciiva.com/28458/1912851-28458684.pdf?src-supplier=Element14, ComponentLink12Description=https://datasheet.ciiva.com/96/e-wx-96650.pdf?src-supplier=Digi-Key, ComponentLink12URL=https://datasheet.ciiva.com/96/e-wx-96650.pdf?src-supplier=Digi-Key, ComponentLink13Description=https://datasheet.ciiva.com/96/e-wx-96651.pdf?src-supplier=Digi-Key, ComponentLink13URL=https://datasheet.ciiva.com/96/e-wx-96651.pdf?src-supplier=Digi-Key, ComponentLink14Description=https://datasheet.ciiva.com/96/e-wx-96652.pdf?src-supplier=Digi-Key, ComponentLink14URL=https://datasheet.ciiva.com/96/e-wx-96652.pdf?src-supplier=Digi-Key, ComponentLink15Description=https://datasheet.ciiva.com/11687/e-wx-11687148.pdf?src-supplier=Avnet, ComponentLink15URL=https://datasheet.ciiva.com/11687/e-wx-11687148.pdf?src-supplier=Avnet, ComponentLink16Description=https://datasheet.ciiva.com/16512/e-wx-16512638.pdf?src-supplier=Future+Electronics, ComponentLink16URL=https://datasheet.ciiva.com/16512/e-wx-16512638.pdf?src-supplier=Future+Electronics, Construction=Cylindrical, Diameter=8mm, Dissipation Factor=0.14%, Height=5.4mm, Height - Seated (Max)=0.213inch, Lead Diameter=0.8mm, Lead Free="Lead Free", Lead Pitch=2.3mm, Length=5.4mm, Life (Hours)=2000Hour, Manufacturer Part Number=UWX1E101MCL1GB, Mount="Surface Mount", Number of Pins=2, Packaging="Tape and Reel", Polarity=Polar, Pricing 1="1=0.43, 10=0.301, 50=0.211, 100=0.1808, 500=0.13558 (USD)", Pricing 2="1=0.43000, 10=0.30100, 50=0.21100, 100=0.18080, 500=0.13558 (USD)", Radiation Hardening=No, REACH SVHC="No SVHC", Ripple Current (AC)=110mA, RoHS=Yes, RoHS Compliant=Yes, Series=WX, Stock 1=30613, Stock 2=25010, Supplier 1=Digi-Key, Supplier 2=Digi-Key, Supplier Part Number 2=493-2113-1-ND, Termination=SMD/SMT, Voltage Rating=25V, Voltage Rating (DC)=25V, Weight=0.01lb, Width=0.25inch
C29: library part F981E105MMA, "CAP TANT 1UF 20% 25V 0603", Case/Package=0603, ESR (Equivalent Series Resistance)=10R, MANUFACTURER="Kyocera AVX", Max Operating Temperature=125°C, Min Operating Temperature=-55°C, Supplier Part Number 1=478-8658-1-ND, Tolerance=20%, Voltage Rating=25V, Capacitance=1uF, Category="Tantalum Capacitors", ComponentLink1Description=http://www.mouser.com/ds/2/40/f98-775787.pdf?src-supplier=Mouser, ComponentLink1URL=http://www.mouser.com/ds/2/40/f98-775787.pdf?src-supplier=Mouser, ComponentLink2Description=http://www.farnell.com/datasheets/2096554.pdf?src-supplier=Newark, ComponentLink2URL=http://www.farnell.com/datasheets/2096554.pdf?src-supplier=Newark, ComponentLink3Description=http://datasheets.avx.com/F98.pdf?src-supplier=Digi-Key, ComponentLink3URL=http://datasheets.avx.com/F98.pdf?src-supplier=Digi-Key, Features="General Purpose", Manufacturer Part Number=F981E105MMA, Mount="Surface Mount", Packaging="Tape and Reel", Pricing 1="1=0.79000, 10=0.55800, 50=0.42220, 100=0.36770, 500=0.27236, 1000=0.23151 (USD)", RoHS=Yes, RoHS Compliant=Yes, Stock 1=11167, Supplier 1=Digi-Key
C31 C32: library part CC0603JRNPO9BN300, "CAP 30pF NP0 0603 50 V ±5 % SMD", Case Code (Imperial)=0603, Case Code (Metric)=1608, Dielectric=C0G, Insulation Resistance=10GR, MANUFACTURER=Yageo, Max Operating Temperature=125°C, Min Operating Temperature=-55°C, Resistor Type=Ceramic, Supplier Part Number 1=311-3357-1-ND, Tolerance=5%, Voltage Rating=50V, Capacitance=30pF, Case/Package=0603, Category="Ceramic Capacitors", ComponentLink1Description=https://datasheet.ciiva.com/26862/getdatasheetpartid-403531-26862766.pdf?src-supplier=Verical, ComponentLink1URL=https://datasheet.ciiva.com/26862/getdatasheetpartid-403531-26862766.pdf?src-supplier=Verical, ComponentLink2Description=https://datasheet.ciiva.com/13264/upy-gp-np0-16v-to-50v-8-3714-13264406.pdf?src-supplier=Mouser, ComponentLink2URL=https://datasheet.ciiva.com/13264/upy-gp-np0-16v-to-50v-8-3714-13264406.pdf?src-supplier=Mouser, ComponentLink3Description=https://datasheet.ciiva.com/7978/1132289-7978140.pdf?src-supplier=Element14, ComponentLink3URL=https://datasheet.ciiva.com/7978/1132289-7978140.pdf?src-supplier=Element14, ComponentLink4Description=https://datasheet.ciiva.com/28450/1443161-28450494.pdf?src-supplier=Element14, ComponentLink4URL=https://datasheet.ciiva.com/28450/1443161-28450494.pdf?src-supplier=Element14, Construction=Flat, Depth=0.8mm, Dissipation Factor=0.1%, Height=0.8mm, Lead Free="Lead Free", Length=1.6mm, Manufacturer Part Number=CC0603JRNPO9BN300, Mount="Surface Mount", Number of Pins=2, Packaging="Tape and Reel", Pricing 1="1=0.10000, 10=0.06800, 50=0.03700, 100=0.03020, 500=0.02160, 1000=0.01697 (USD)", Radiation Hardening=No, REACH SVHC="No SVHC", RoHS=Yes, RoHS Compliant=Yes, Series=CC, Stock 1=36700, Supplier 1=Digi-Key, Termination=SMD/SMT, Thickness=0.035inch, Voltage Rating (DC)=50V, Weight=7.1E-05oz, Width=0.031inch
D1: "SCHOTTKY DIODE SMB 100V 5A", MANUFACTURER=MDD, Package=SMB, Manufacturer Part No=SS510B
D2: "DIODE ZENER 16V 1.5W SMA", Case/Package=SMA, Forward Voltage=1.5V, MANUFACTURER="ON Semiconductor", Max Operating Temperature=150°C, Max Power Dissipation=1.5W, Max Reverse Current=500nA, Min Operating Temperature=-65°C, Package Quantity=1, Power Dissipation=500mW, Supplier Part Number 1=26K5257, Test Current=23.4mA, Tolerance=5%, Voltage Rating (DC)=16V, Zener Current=94mA, Category="Zener Diodes", ComponentLink1Description=https://datasheet.ciiva.com/15142/getdatasheetpartid-39534-15142033.pdf?src-supplier=Verical, ComponentLink1URL=https://datasheet.ciiva.com/15142/getdatasheetpartid-39534-15142033.pdf?src-supplier=Verical, ComponentLink2Description=https://datasheet.ciiva.com/30478/0900766b8127698c-30478429.pdf?src-supplier=RSComponents, ComponentLink2URL=https://datasheet.ciiva.com/30478/0900766b8127698c-30478429.pdf?src-supplier=RSComponents, ComponentLink3Description=https://datasheet.ciiva.com/8026/1sma5913bt3-d-8026927.pdf?src-supplier=Element14, ComponentLink3URL=https://datasheet.ciiva.com/8026/1sma5913bt3-d-8026927.pdf?src-supplier=Element14, ComponentLink4Description=https://datasheet.ciiva.com/26092/1sma5913bt3-d-26092437.pdf?src-supplier=Avnet+Europe, ComponentLink4URL=https://datasheet.ciiva.com/26092/1sma5913bt3-d-26092437.pdf?src-supplier=Avnet+Europe, ComponentLink5Description=https://datasheet.ciiva.com/895/1sma5913bt3-d-895337.pdf?src-supplier=Digi-Key, ComponentLink5URL=https://datasheet.ciiva.com/895/1sma5913bt3-d-895337.pdf?src-supplier=Digi-Key, ComponentLink6Description=https://datasheet.ciiva.com/895/1sma5913bt3-d-895338.pdf?src-supplier=Digi-Key, ComponentLink6URL=https://datasheet.ciiva.com/895/1sma5913bt3-d-895338.pdf?src-supplier=Digi-Key, ComponentLink7Description=https://datasheet.ciiva.com/895/1sma5913bt3-d-895336.pdf?src-supplier=Digi-Key, ComponentLink7URL=https://datasheet.ciiva.com/895/1sma5913bt3-d-895336.pdf?src-supplier=Digi-Key, ComponentLink8Description=https://datasheet.ciiva.com/49028/70339291-49028059.pdf?src-supplier=Allied+Electronics, ComponentLink8URL=https://datasheet.ciiva.com/49028/70339291-49028059.pdf?src-supplier=Allied+Electronics, Contact Plating=Tin,Matte, Element Configuration=Single, ESD Protection=Yes, Halogen Free="Halogen Free", Height=2.05mm, Impedance=10R, Lead Free="Lead Free", Length=4.57mm, Manufacturer Part Number=1SMA5930BT3G, Max Reverse Leakage Current=500nA, Number of Pins=2, Packaging="Tape and Reel", Power Rating=1.5W, Pricing 1="5000=0.16900 (USD)", Radiation Hardening=No, REACH SVHC="No SVHC", RoHS=Yes, RoHS Compliant=Yes, Stock 1=52, Supplier 1=Avnet, Voltage Tolerance=5%, Width=2.92mm, Working Voltage=16V, Zener Voltage=16V
D3 D4 D5: "TVS DIODE 5VWM 9.2VC SMA", Breakdown Voltage=7V, Case/Package=DO-214AC, Clamping Voltage=9.2V, Leakage Current=1.6mA, MANUFACTURER=Bourns, Max Operating Temperature=150°C, Max Power Dissipation=400W, Max Surge Current=40A, Min Breakdown Voltage=6.4V, Min Operating Temperature=-55°C, Operating Supply Voltage=5V, Package Quantity=1, Peak Pulse Current=43.5A, Power Line Protection=No, Resistor Type=Zener, Supplier Part Number 1=1742497P, Test Current=10mA, Category="TVS Diodes", Contact Plating=Tin, Diode Type=ZENER, Direction=Bidirectional, Element Configuration=Single, ESD Protection=Yes, Manufacturer Part Number=SMAJ5.0CA, Max Breakdown Voltage=7V, Max Reverse Leakage Current=1.6mA, Mount="Surface Mount", Number of Bidirectional Channels=1, Number of Channels=1, Number of Elements=1, Number of Pins=2, Packaging="Tape and Reel", Peak Pulse Power=400W, Polarity=Bidirectional, Pricing 1="100=0.22700, 250=0.19600, 500=0.17600, 1000=0.12900 (GBP)", Radiation Hardening=No, REACH SVHC="No SVHC", Reverse Breakdown Voltage=6.4V, Reverse Standoff Voltage=5V, RoHS=Yes, RoHS Compliant=Yes, Series=SMAJ, Stock 1=4825, Supplier 1=RSComponents, Termination=SMD/SMT
J1: "CONN HEADER SMD 10POS 1.27MM", Color=Black, Current Rating=1.75A, MANUFACTURER=Samtec, Max Operating Temperature=125°C, Min Operating Temperature=-55°C, Package Quantity=550, Supplier Part Number 1=SAM13165CT-ND, Category="Headers and Wire Housings", ComponentLink1Description=https://datasheet.ciiva.com/23735/81359-23735917.pdf?src-supplier=Newark, ComponentLink1URL=https://datasheet.ciiva.com/23735/81359-23735917.pdf?src-supplier=Newark, ComponentLink2Description=https://datasheet.ciiva.com/10245/ftsh-mt-10245289.pdf?src-supplier=Avnet, ComponentLink2URL=https://datasheet.ciiva.com/10245/ftsh-mt-10245289.pdf?src-supplier=Avnet, ComponentLink3Description=https://datasheet.ciiva.com/739/ftsh-1xx-xx-xxx-dv-xxx-mkt-739005.pdf?src-supplier=Digi-Key, ComponentLink3URL=https://datasheet.ciiva.com/739/ftsh-1xx-xx-xxx-dv-xxx-mkt-739005.pdf?src-supplier=Digi-Key, Connector Type="Male Pin", Contact Material=Bronze, Contact Mating Length=0.12inch, Contact Plating=Gold, Contact Type="Male Pin", Depth=3.43mm, Gender=Male, Housing Color=Black, Housing Material=Polymer, Lead Free="Lead Free", Length=6.35mm, Manufacturer Part Number=FTSH-105-01-L-DV-K-TR, Max Current Rating=1.75A, Mount="Surface Mount", Number of Contacts=10, Number of Positions=10, Number of Rows=2, Orientation=Straight, Packaging="Tape and Reel", Pitch=1.27mm, Pricing 1="1=4.28000, 10=3.88500, 100=3.42300 (USD)", Radiation Hardening=No, REACH SVHC="No SVHC", RoHS=Yes, RoHS Compliant=Yes, Row Spacing=0.05inch, Series=FTSH, Stock 1=684, Supplier 1=Digi-Key, Termination=Solder
L1: library part MGFL2012F100MT-LF, "500mA 10uH ±20% 320mΩ 0805 Inductors", MANUFACTURER=Microgate, Package=0805, ComponentLink1Description="New link", ComponentLink1URL=https://lcsc.com/product-detail/Inductors-SMD_microgate-MGFL2012F100MT-LF_C281113.html, Manufacturer Part No=MGFL2012F100MT-LF
LED1 LED2 LED3: "LED RED CLEAR CHIP SMD", Case Code (Imperial)=0402, Case Code (Metric)=1005, Color=Red, Forward Voltage=1.95V, Lens Color=Colorless, MANUFACTURER=SunLED, Supplier Part Number 1=1497-1174-6-ND, Test Current=20mA, Case/Package=0402, ComponentLink1Description=http://www.sunledusa.com/products/spec/XZMDK68W-2.pdf?src-supplier=Digi-Key, ComponentLink1URL=http://www.sunledusa.com/products/spec/XZMDK68W-2.pdf?src-supplier=Digi-Key, ComponentLink2Description=https://www.sunledusa.com/products/spec/XZMDK68W-2.pdf?src-supplier=Digi-Key, ComponentLink2URL=https://www.sunledusa.com/products/spec/XZMDK68W-2.pdf?src-supplier=Digi-Key, Dominant Wavelength=630nm, Height=0.6mm, Length=1mm, Lens Transparency=Clear, Luminous Intensity=69mcd, Manufacturer Part Number=XZMDK68W-2, Mount="Surface Mount", Packaging="Tape and Reel", Pricing 1="1=0.43, 10=0.306, 100=0.136, 500=0.0952, 1000=0.0782 (USD)", Stock 1=69539, Supplier 1=Digi-Key, Viewing Angle=120°, Width=0.5mm
LS1: "NO 2700Hz 85dB @ 3V, 10cm 3V Φ9mm SMD,9x3.2mm Buzzers RoHS", Frequency - Self Resonant=2700Hz, MANUFACTURER=Fengming, Operating Voltage="2 ~ 4V", Package=SMD,9x3.2mm, Rated Voltage=3V
P1 P3 P4 P5: library part "Header 1x2", "CONN HEADER VERT 2POS 2.54MM", Color=Black, Current Rating=3A, MANUFACTURER="Wurth Electronics", Max Operating Temperature=125°C, Min Operating Temperature=-40°C, Supplier Part Number 1=732-5315-ND, Voltage Rating=250V, ComponentLink1Description=http://www.mouser.com/ds/2/445/6130xx11121-538006.pdf?src-supplier=Mouser, ComponentLink1URL=http://www.mouser.com/ds/2/445/6130xx11121-538006.pdf?src-supplier=Mouser, Connector Type="Male Pin", Contact Gender=Male, Contact Material="Copper Alloy,Copper", Contact Mating Length=0.236inch, Contact Plating=Gold, Gender=Male, Housing Material=PBT, Lead Free="Lead Free", Manufacturer Part Number=61300211121, Mount="Through Hole", Number of Contacts=2, Number of Positions=2, Number of Rows=1, Packaging=Bulk, Pitch=0.1inch, Pricing 1="1=0.13, 10=0.106, 25=0.088, 50=0.074, 100=0.067, 1000=0.061 (USD)", REACH SVHC=Unknown, Stock 1=219205, Supplier 1=Digi-Key, Termination="Through Hole"
P2 P6: library part "Header 1X3", "CONN HEADER VERT 3POS 2.54MM", Color=Black, MANUFACTURER="Wurth Electronics", Supplier Part Number 1=732-5316-ND, ComponentLink1Description=http://www.farnell.com/cad/1737268.pdf?src-supplier=Element14, ComponentLink1URL=http://www.farnell.com/cad/1737268.pdf?src-supplier=Element14, ComponentLink2Description=https://katalog.we-online.de/em/datasheet/6130xx11121.pdf?src-supplier=Digi-Key, ComponentLink2URL=https://katalog.we-online.de/em/datasheet/6130xx11121.pdf?src-supplier=Digi-Key, Connector Type="Male Pin", Contact Material=Copper, Contact Mating Length=0.236inch, Contact Plating=Gold, Gender=Male, Lead Free="Lead Free", Manufacturer Part Number=61300311121, Mount="Through Hole", Number of Contacts=3, Number of Positions=3, Number of Rows=1, Packaging=Bulk, Pitch=0.1inch, Pricing 1="1=0.13, 10=0.106, 25=0.088, 50=0.074, 100=0.067, 1000=0.061 (USD)", REACH SVHC=Unknown, Stock 1=81286, Supplier 1=Digi-Key, Termination=Solder
P7 P10: library part "Header 1x4", "CONN HEADER VERT 4POS 2.54MM", Color=Black, MANUFACTURER="Wurth Electronics", Supplier Part Number 1=732-5317-ND, ComponentLink1Description=http://www.farnell.com/cad/1737268.pdf?src-supplier=Element14, ComponentLink1URL=http://www.farnell.com/cad/1737268.pdf?src-supplier=Element14, ComponentLink2Description=https://katalog.we-online.de/em/datasheet/6130xx11121.pdf?src-supplier=Digi-Key, ComponentLink2URL=https://katalog.we-online.de/em/datasheet/6130xx11121.pdf?src-supplier=Digi-Key, Connector Type="Male Pin", Contact Material=Copper, Contact Mating Length=0.236inch, Contact Plating=Gold, Gender=Male, Lead Free="Lead Free", Manufacturer Part Number=61300411121, Mount="Through Hole", Number of Contacts=4, Number of Positions=4, Number of Rows=1, Packaging=Bulk, Pitch=0.1inch, Pricing 1="1=0.18, 10=0.153, 25=0.1272, 50=0.106, 100=0.096, 1000=0.088 (USD)", REACH SVHC=Unknown, Stock 1=20544, Supplier 1=Digi-Key, Termination=Solder
P8: library part "Header 2x3", "CONN HEADER VERT 6POS 2.54MM", Color=Black, Contact Resistance=25mR, Current Rating=3A, Insulation Resistance=10GR, MANUFACTURER=Harwin, Max Operating Temperature=105°C, Min Operating Temperature=-40°C, Package Quantity=1000, Supplier Part Number 1=952-2121-ND, ComponentLink1Description=http://uk.rs-online.com/webdocs/1406/0900766b81406898.pdf?src-supplier=RSComponents, ComponentLink1URL=http://uk.rs-online.com/webdocs/1406/0900766b81406898.pdf?src-supplier=RSComponents, ComponentLink2Description=https://www.verical.com/server-webapp/html/getDatasheet?partID=483857&src-supplier=Verical, ComponentLink2URL=https://www.verical.com/server-webapp/html/getDatasheet?partID=483857&src-supplier=Verical, ComponentLink3Description=http://www.farnell.com/datasheets/2368211.pdf?src-supplier=Element14, ComponentLink3URL=http://www.farnell.com/datasheets/2368211.pdf?src-supplier=Element14, Connector Type="Male Pin", Contact Material=Bronze,Brass, Contact Mating Length=0.24inch, Contact Plating=Tin, Depth=5.08mm, Gender=Male, Housing Color=Black, Housing Material=Nylon, Length=7.62mm, Manufacturer Part Number=M20-9980346, Max Current Rating=3A, Mount="Through Hole", Number of Contacts=6, Number of Positions=6, Number of Rows=2, Orientation=Straight, Packaging=Bag, Pitch=2.54mm, Pricing 1="1=0.24, 10=0.229, 100=0.1586, 500=0.1342, 1000=0.1098, 5000=0.0976, 10000=0.08845 (USD)", Radiation Hardening=No, REACH SVHC="No SVHC", Row Spacing=0.1inch, Stock 1=19517, Supplier 1=Digi-Key, Termination=Solder
P9: "CONN HDR 16POS 0.1 GOLD PCB", Color=Black, MANUFACTURER=Sullins, Package Quantity=1000, Supplier Part Number 1=S7049-ND, Connector Type=Header,Socket, Contact Material=Bronze, Contact Plating=Gold, Height=8.5mm, Housing Material=Plastic, Lead Free="Lead Free", Length=41.1mm, Manufacturer Part Number=PPPC161LFBN-RC, Mount="Through Hole", Number of Positions=16, Number of Rows=1, Packaging=Bulk, Pitch=0.1inch, Pricing 1="1=1.02, 10=0.897, 100=0.7742, 500=0.63342, 1000=0.56304, 5000=0.5083 (USD)", Stock 1=6865, Supplier 1=Digi-Key, Termination=Solder, Width=2.5mm
P11: library part "Header 2x4", "CONN HEADER VERT 8POS 2.54MM", Color=Black, Contact Resistance=30mR, Current Rating=3A, MANUFACTURER=Harwin, Max Operating Temperature=105°C, Min Operating Temperature=-40°C, Package Quantity=1000, Supplier Part Number 1=952-1788-ND, Voltage Rating=750V, ComponentLink1Description=https://cdn.harwin.com/pdfs/Harwin_PC_Connectors_M20.pdf?src-supplier=Digi-Key, ComponentLink1URL=https://cdn.harwin.com/pdfs/Harwin_PC_Connectors_M20.pdf?src-supplier=Digi-Key, Connector Type="Male Pin", Contact Material=Brass, Contact Mating Length=0.228inch, Contact Plating=Tin, Depth=5.08mm, Housing Color=Black, Housing Material=Nylon, Length=10.16mm, Manufacturer Part Number=M20-9760446, Max Current Rating=3A, Mount="Through Hole", Number of Positions=8, Number of Rows=2, Orientation=Straight, Packaging=Bulk, Pitch=2.54mm, Pricing 1="1=0.3, 10=0.28, 100=0.196, 500=0.168, 1000=0.14, 5000=0.12, 10000=0.112 (USD)", Row Spacing=0.1inch, Stock 1=6769, Supplier 1=Digi-Key, Termination=Solder
P12: library part "Female Header 2x8", "CONN HDR 16POS 0.1 TIN PCB", Color=Black, MANUFACTURER=Sullins, Package Quantity=1000, Supplier Part Number 1=S7076-ND, Category="Headers and Wire Housings", ComponentLink1Description=http://www.sullinscorp.com/catalogs/101_Page80-81_HEADER_.100_2.54mm_FEMALE.pdf?src-supplier=Future+Electronics, ComponentLink1URL=http://www.sullinscorp.com/catalogs/101_Page80-81_HEADER_.100_2.54mm_FEMALE.pdf?src-supplier=Future+Electronics, ComponentLink2Description=https://drawings-pdf.s3.amazonaws.com/10492.pdf?src-supplier=Digi-Key, ComponentLink2URL=https://drawings-pdf.s3.amazonaws.com/10492.pdf?src-supplier=Digi-Key, Connector Type=Header, Contact Material=Bronze, Contact Plating=Tin, Contact Type="Female Socket", Height=8.5mm, Housing Material=Plastic, Lead Free="Lead Free", Length=20.8mm, Manufacturer Part Number=PPTC082LFBN-RC, Mount="Through Hole", Number of Positions=16, Number of Rows=2, Packaging=Bulk, Pitch=0.1inch, Pricing 1="1=0.99000, 10=0.83600, 80=0.75038, 440=0.61398, 1000=0.54576, 5000=0.49270 (USD)", RoHS=Yes, Row Spacing=0.1inch, Stock 1=25190, Supplier 1=Digi-Key, Termination=Solder, Width=5mm
P13: library part "Header 1x6", "CONN HEADER VERT 6POS 2.54MM", Color=Black, Current Rating=3A, MANUFACTURER="Wurth Electronics", Max Operating Temperature=125°C, Min Operating Temperature=-40°C, Supplier Part Number 1=732-5319-ND, Voltage Rating=250V, ComponentLink1Description=http://www.farnell.com/cad/1737268.pdf?src-supplier=Element14, ComponentLink1URL=http://www.farnell.com/cad/1737268.pdf?src-supplier=Element14, ComponentLink2Description=https://katalog.we-online.de/em/datasheet/6130xx11121.pdf?src-supplier=Digi-Key, ComponentLink2URL=https://katalog.we-online.de/em/datasheet/6130xx11121.pdf?src-supplier=Digi-Key, ComponentLink3Description=http://www.mouser.com/ds/2/445/6130xx11121-538006.pdf?src-supplier=Mouser, ComponentLink3URL=http://www.mouser.com/ds/2/445/6130xx11121-538006.pdf?src-supplier=Mouser, Connector Type="Male Pin", Contact Gender=Male, Contact Material="Copper Alloy,Copper", Contact Mating Length=0.236inch, Contact Plating=Gold, Gender=Male, Housing Material=PBT, Lead Free="Lead Free", Manufacturer Part Number=61300611121, Mount="Through Hole", Number of Contacts=6, Number of Positions=6, Number of Rows=1, Packaging=Bulk, Pitch=0.1inch, Pricing 1="1=0.33, 10=0.279, 25=0.232, 50=0.194, 100=0.176, 1000=0.16 (USD)", REACH SVHC=Unknown, Stock 1=14573, Supplier 1=Digi-Key, Termination="Through Hole"
Q1 Q4 Q11: "MOSFET P-CH 20V 3.7A SOT23", Case/Package=SOT-23, Continuous Drain Current (ID)=3.7A, Current Rating=-3.7A, Drain to Source Breakdown Voltage=-20V, Drain to Source Resistance=65mR, Drain to Source Voltage (Vdss)=20V, Gate to Source Voltage (Vgs)=12V, Input Capacitance=633pF, MANUFACTURER="International Rectifier", Max Operating Temperature=150°C, Max Power Dissipation=1.3W, Min Operating Temperature=-55°C, Package Quantity=1, Supplier Part Number 1=06X2796, Threshold Voltage=-550mV, Category=MOSFETs, ComponentLink1Description=https://datasheet.ciiva.com/7799/13209-7799017.pdf?src-supplier=Element14, ComponentLink1URL=https://datasheet.ciiva.com/7799/13209-7799017.pdf?src-supplier=Element14, ComponentLink2Description=https://datasheet.ciiva.com/34302/1563729-34302500.pdf?src-supplier=Jameco, ComponentLink2URL=https://datasheet.ciiva.com/34302/1563729-34302500.pdf?src-supplier=Jameco, ComponentLink3Description=https://datasheet.ciiva.com/28515/irlml6402pbf-28515795.pdf?src-supplier=Element14, ComponentLink3URL=https://datasheet.ciiva.com/28515/irlml6402pbf-28515795.pdf?src-supplier=Element14, ComponentLink4Description=https://datasheet.ciiva.com/7333/irlml6402-7333200.pdf?src-supplier=Newark, ComponentLink4URL=https://datasheet.ciiva.com/7333/irlml6402-7333200.pdf?src-supplier=Newark, ComponentLink5Description=https://datasheet.ciiva.com/29326/162833-da-01-en-irlml-6402tr-29326798.pdf?src-supplier=Conrad, ComponentLink5URL=https://datasheet.ciiva.com/29326/162833-da-01-en-irlml-6402tr-29326798.pdf?src-supplier=Conrad, ComponentLink6Description=https://datasheet.ciiva.com/7799/13209-7799018.pdf?src-supplier=Element14, ComponentLink6URL=https://datasheet.ciiva.com/7799/13209-7799018.pdf?src-supplier=Element14, ComponentLink7Description=https://datasheet.ciiva.com/936/irlml6402pbf-936987.pdf?src-supplier=Digi-Key, ComponentLink7URL=https://datasheet.ciiva.com/936/irlml6402pbf-936987.pdf?src-supplier=Digi-Key, ComponentLink8Description=https://datasheet.ciiva.com/936/irlml6402pbf-936988.pdf?src-supplier=Digi-Key, ComponentLink8URL=https://datasheet.ciiva.com/936/irlml6402pbf-936988.pdf?src-supplier=Digi-Key, ComponentLink9Description=https://datasheet.ciiva.com/16311/irlml6402pbf-16311535.pdf?src-supplier=Future+Electronics, ComponentLink9URL=https://datasheet.ciiva.com/16311/irlml6402pbf-16311535.pdf?src-supplier=Future+Electronics, Drain-source On Resistance-Max=65mR, Dual Supply Voltage=-20V, Element Configuration=Single, Fall Time=381ns, Height=1.02mm, Lead Free="Lead Free", Length=3.04mm, Manufacturer Part Number=IRLML6402TRPBF, Mount="Surface Mount", Nominal Vgs=-550mV, Number of Elements=1, Number of Pins=3, On-State Resistance=65mR, Packaging="Tape and Reel", Power Dissipation=1.3W, Radiation Hardening=No, Rds On Max=65mR, REACH SVHC="No SVHC", Rise Time=48ns, RoHS=Yes, RoHS Compliant=Yes, Series=HEXFET®, Supplier 1=Newark, Termination=SMD/SMT, Turn-Off Delay Time=588ns, Turn-On Delay Time=350ns, Voltage Rating (DC)=-20V, Width=1.4mm